# Altium PCB ZasilaczPCB.PcbDoc
Units mm, origin at the board's own origin, x right, y up, seen from the top; angles counter-clockwise.
Board outline 111.5 x 50 mm, 2 copper layers (Top Layer, Bottom Layer), stack 1.571 mm thick; 20 components, 8 nets, 57 pads, 28 vias.
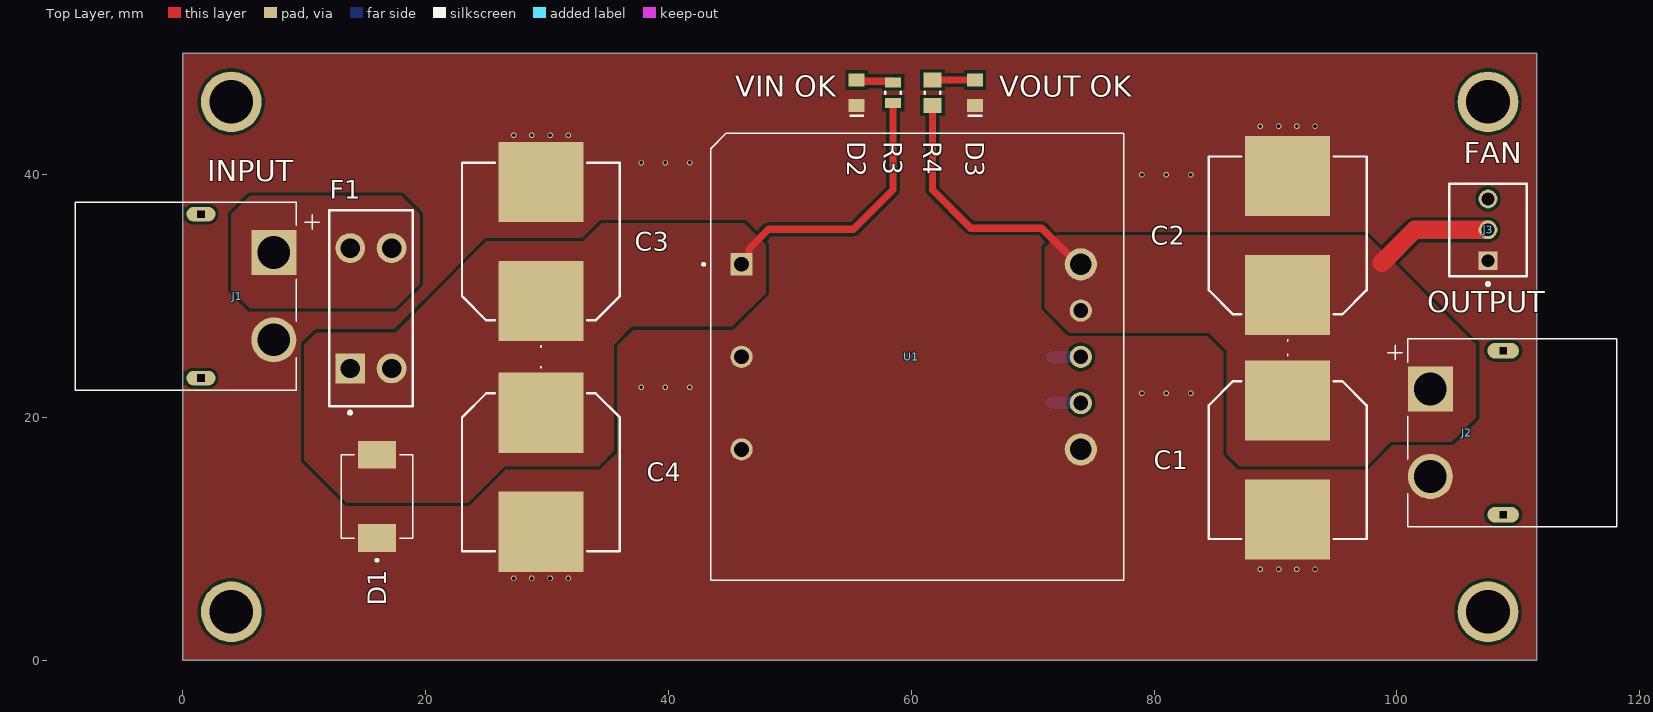
[diagram p0: Top Layer view]
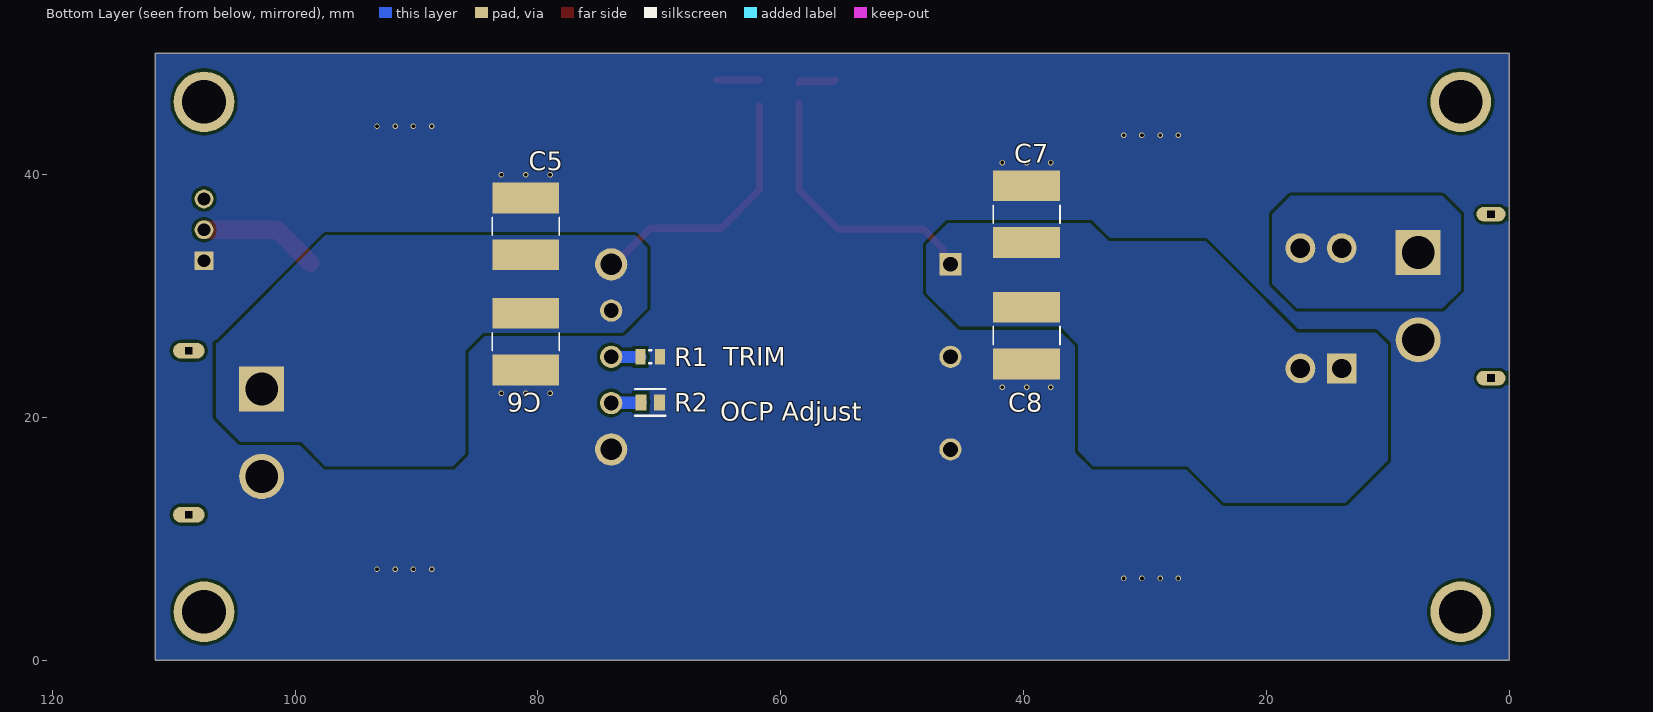
[diagram p1: Bottom Layer view, seen from below]

## Layer stack, top to bottom
Top Solder: solder mask 0.0102, Solder Resist, Dk 3.5
Top Layer: signal copper 0.0356
Dielectric 1: dielectric 1.5, FR-4, Dk 4.8
Bottom Layer: signal copper 0.0356
Bottom Solder: solder mask 0.0102, Solder Resist, Dk 3.5

## Board outline
0,0 111.5,0 111.5,50 0,50

## Design rules (kind name [scope] priority, off if disabled: settings)
Clearance [All] p1: gap=0.254 ignorepadtopadclearanceinfootprint=TRUE
PlaneConnect [All] p1: planeconnectstyle=Direct reliefexpansion=0.508 reliefentries=4 reliefconductorwidth=0.254 reliefairgap=0.254
PolygonConnect [All] p1: connectstyle=Direct reliefconductorwidth=0.254 reliefentries=4 polygonreliefangle="90 Angle" airgapwidth=0.254
RoutingVias [All] p1: holewidth=0.3 width=0.45 viastyle="Through Hole" minholewidth=0.2 minwidth=0.45 maxholewidth=0.3 maxwidth=0.7
SolderMaskExpansion [All] p1: expansion=0.102 istentingtop=FALSE
SupplyNets "Schematic Supply Nets_5" [InNet('VBAT')] p1: voltage=0.000
SupplyNets "Schematic Supply Nets_4" [InNet('+19')] p2: voltage=0.000
SupplyNets "Schematic Supply Nets_1" [InNet('VIN')] p3: voltage=0.000
SupplyNets "Schematic Supply Nets" [InNet('GND')] p4: voltage=0.000
Width [All] p1: maxlimit=30 minlimit=0.254 preferedwidth=0.254 minimp=50.000000 maximp=50.000000 favimp=50.000000
29 further rules are at their usual default settings.

## Components (designator, comment, footprint, x,y, rotation, side; value= is the part's Value field where it differs from the comment)
C1 "330uF" RAHT1331M1UGL5005E 91,16.5 r0 top
C2 "330uF" RAHT1331M1UGL5005E 91,35 r180 top
C3 "330uF" RAHT1331M1UGL5005E 29.5,34.5 r180 top
C4 "330uF" RAHT1331M1UGL5005E 29.5,15.5 r0 top
C5 "22uF" CAPC6050X550N 81,35.75 r270 bottom
C6 "22uF" CAPC6050X550N 81,26.25 r90 bottom
C7 "22uF" CAPC6050X550N 39.75,36.75 r270 bottom
C8 "22uF" CAPC6050X550N 39.75,26.75 r90 bottom
D1 "SMDJ36A" DIOM6859X262N 16,13.5 r90 top
D2 "VIN_OK" WL-SMCW_0805_150080xx75000 55.5,46.75 r90 top
D3 "VOUT_OK" WL-SMCW_0805_150080xx75000 65.25,46.75 r90 top
F1 "3568" FP-3568-MFG 15.5,29 r90 top
J1 "XT60PW-M" AMASS_XT60PW-M 1.5,30 r270 top
J2 "XT60PW-F" AMASS_XT60PW-F 102.75,18.75 r90 top
J3 "FAN19V" MOLX-22-23-2031_V 107.5,35.46 r90 top
R1 "294R" RESC2013X60X35LL10T20 70.75,25 r0 bottom
R2 "180k" FP-CRGP0805-IPC_C 70.75,21.25 r180 bottom value=180KΩ
R3 "15k" FP-CRCW0805-e3-IPC_C 58.5,46.75 r90 top
R4 "10k" FP-CRCW0805-e3-IPC_A 61.75,46.75 r90 top
U1 "I7A4W033A033V-0F3-R" CONV_I7A4W033A033V-0F3-R 60.5,25 r0 top

## Footprints (in the part's own frame and the unit in brackets; to place one, negate y for a bottom-side part, rotate by r counter-clockwise, add the part's x,y. Pads: shape width x height; smd on the part's side, far side on the other; paste and mask are expansions set on the pad)
AMASS_XT60PW-F [mm]
  rect 3.716x3.716 / inner round 3.716 / far side rect 3.716x3.716 hole 2.7 mask+0.102: 1(3.6,0)
  round 3.716 hole 2.7 mask+0.102: 2(-3.6,0)
  oval 1.3x2.6 hole 0.6 square mask+0.102: SH1(-6.75,-6) SH2(6.75,-6)
  silkscreen extent -7.75,-15.35 7.75,3.5, body extent -7.75,-15.35 7.75,1.85, height 8.4
AMASS_XT60PW-M [mm]
  rect 3.716x3.716 / inner round 3.716 / far side rect 3.716x3.716 hole 2.7 mask+0.102: 1(-3.6,6)
  round 3.716 hole 2.7 mask+0.102: 2(3.6,6)
  oval 1.2x2.4 hole 0.6 square mask+0.102: SH1(-6.75,0) SH2(6.75,0)
  silkscreen extent -7.75,-10.35 7.75,9.75, body extent -7.75,-10.35 7.75,7.85, height 8.4
CAPC6050X550N [mm]
  rect 2.53x5.51 smd paste+0 mask+0.102: 1(-2.336,0) 2(2.336,0)
  silkscreen extent -0.75,-2.75 0.75,2.75, body extent -3,-2.5 3,2.5, height 5.5
CONV_I7A4W033A033V-0F3-R [mm]
  rect 1.83x1.83 / inner round 1.83 / far side rect 1.83x1.83 hole 1.22: 1(-14.478,7.62)
  round 1.83 hole 1.22: 2(-14.478,0) 3(-14.478,-7.62) 5(13.462,-3.81) 6(13.462,0) 7(13.462,3.81)
  round 2.655 hole 1.77: 4(13.462,-7.62) 8(13.462,7.62)
  silkscreen extent -17.7,-18.41 17.02,18.41, body extent -17.04,-18.41 17,18.41, height 25.1
DIOM6859X262N [mm]
  rect 2.29x3.12 smd: A(3.43,0) C(-3.43,0)
  silkscreen extent -5.35,-2.95 3.43,2.95, body extent -3.97,-2.95 3.97,2.95, height 2.62
FP-3568-MFG [mm]
  round 2.45 hole 1.6 paste-2539.97 mask+0: 1(-4.96,-1.7) 2(4.96,-1.7) 2(4.96,1.7)
  rect 2.45x2.45 hole 1.6 paste-2539.97 mask+0: 1(-4.96,1.7)
  silkscreen extent -8.72,-3.43 8.07,3.43, body extent -8.17,-3.53 8.17,3.53, height 0.25
FP-CRCW0805-e3-IPC_A [mil]
  rect 47.5x59.38 smd paste+0 mask+0: 1(-41.37,0) 2(41.37,0)
  silkscreen extent -3,-25 3,25, body extent -85,-49 85,49, height 10
FP-CRCW0805-e3-IPC_C [mil]
  rect 31.75x51.5 smd paste+0 mask+0: 1(-33.5,0) 2(33.5,0)
  silkscreen extent -3,-25 3,25, body extent -53,-31 53,31, height 10
FP-CRGP0805-IPC_C [mm]
  rect 0.906x1.31 smd paste+0 mask+0: 1(-0.776,0) 2(0.776,0)
  silkscreen extent -1.23,-1.1 1.23,1.1, body extent -1,-0.63 1,0.63, height 0.65
MOLX-22-23-2031_V [mm] "CONN, 3-Leads, Body 7.62x6.35mm, Pitch 2.54mm"
  rect 1.55x1.55 hole 1.05: 1(-2.54,0)
  round 1.55 hole 1.05: 2(0,0) 3(2.54,0)
  silkscreen extent -4.58,-3.18 3.81,3.18, body extent -3.73,-3.25 3.73,3.1, height 10.67
RAHT1331M1UGL5005E [mm]
  rect 7x6.6 smd: 1(0,4.9) 2(0,-4.9)
  silkscreen extent -6.5,-6.5 6.5,8.7, body extent -6.55,-7.3 6.5,7.1, height 13.52
RESC2013X60X35LL10T20 [mm] "Chip Resistor, 2-Leads, Body 2.00x1.25mm, IPC High Density"
  rect 0.8x1.25 smd: 1(-0.8,0) 2(0.8,0)
  silkscreen extent -0.1,-0.53 0.1,0.53, body extent -1.05,-0.67 1.05,0.67, height 0.6
WL-SMCW_0805_150080xx75000 [mm] "SMD Mono-color Chip LED, body 2.0x1.25mm"
  rect 1.1x1.3 smd: 1(-1.05,0) 2(1.05,0)
  silkscreen extent -2,-0.6 -1.8,0.6, body extent -1,-0.63 1,0.62, height 0.7

## Part data
C1 C2 C3 C4: library part RAHT1331M1UGL5005E, "Aluminum Organic Polymer Capacitors 50V 330uF 105C ESR=2mOhms AECQ 12.5x12.5mm"
C5 C6 C7 C8: library part CAP, "CKG57NX7S1H226M500JH / Specialty Ceramic Capacitors CKG 2220 50V 22uF X7S 20% T: 5mm"
D1: "3000W, 42.1V, 5%, Unidirectional, TVS", Package="SMC-2 Taiwan Semiconductor", Availability="In Stock", Check_prices=https://www.snapeda.com/parts/SMDJ36A/Taiwan+Semiconductor/view-part/?ref=eda, MF="Taiwan Semiconductor", MP=SMDJ36A, Price=None, Purchase-URL=https://pricing.snapeda.com/search/part/SMDJ36A/?ref=eda, SnapEDA_Link=https://www.snapeda.com/parts/SMDJ36A/Taiwan+Semiconductor/view-part/?ref=snap
D2: library part CMP-1426-00011-5, "150080RS75000 / LED Uni-Color Red 630nm 2-Pin Chip 0805(2012Metric) T/R", Case Code (Imperial)=0805, Case Code (Metric)=2012, Color=Red, Forward Current=100mA, Forward Voltage=2V, Manufacturer Lifecycle Status=ACTIVE, Manufacturer Package Identifier="0805 (2012 metric)", Max Junction Temperature (Tj)=95°C, Max Operating Temperature=85°C, Max Reverse Voltage (DC)=5V, Min Operating Temperature=-40°C, Power Dissipation=72mW, Test Current=20mA, Case/Package=0805, Dominant Wavelength=625nm, Height=700µm, Length=2mm, Lens Style="Clear, Rectangular", Lifecycle Status=Production, Luminous Intensity=150mcd, Mount="Surface Mount", Packaging="Tape and Reel", Peak Wavelength=630nm, REACH SVHC=Unknown, RoHS=Compliant, Viewing Angle=140°, Wavelength=625nm, Width=1.25mm, YEOL="1 = Estimated lifetime > 10 years"
D3: library part CMP-1426-00007-5, "150080GS75000 / WURTH ELEKTRONIK - 150080GS75000 - LED, Green, SMD, 0805, 30 mA, 3.2 V, 520 nm", Case Code (Imperial)=0805, Case Code (Metric)=2012, Color=Green, Forward Current=100mA, Forward Voltage=3.2V, Manufacturer Lifecycle Status=ACTIVE, Manufacturer Package Identifier="0805 (2012 metric)", Max Junction Temperature (Tj)=95°C, Max Operating Temperature=85°C, Max Reverse Voltage (DC)=5V, Min Operating Temperature=-40°C, Power Dissipation=105mW, Test Current=20mA, Case/Package=0805, Dominant Wavelength=525nm, Height=700µm, Length=2mm, Lens Style="Clear, Rectangular", Lifecycle Status=Production, Luminous Intensity=450mcd, Mount="Surface Mount", Packaging="Tape and Reel", Peak Wavelength=515nm, REACH SVHC=Unknown, Reverse Voltage=5V, RoHS=Compliant, Viewing Angle=140°, Wavelength=525nm, Width=1.25mm, YEOL="1 = Estimated lifetime > 10 years"
F1: library part CMP-2000-05464-2, Color=Black, Current Rating=20A, Flammability Rating="UL94 V-0", Max Operating Temperature=145°C, Min Operating Temperature=-50°C, Voltage=500V, Approvals=UL, Body Material=Nylon, Contact Material=Brass, Contact Plating=Tin, Depth=6.73mm, Fuse Current=20A, Illumination Type=Illuminated, Lead Free="Lead Free", Length=16mm, Material="Brass, Nylon, Tin", Mount="PCB, Vertical", NexarPartId=8116161, Number of Circuits=1, Number of Poles=1, Orientation=Vertical, REACH SVHC="No SVHC", RoHS=Compliant, Termination="PC Pin", Voltage Rating (AC)=500V
J3: library part CMP-2000-05242-1, "22-23-2031 / Male Header, Pitch 2.54 mm, 1 x 3 Position, Height 8.18 mm, Tail Length 3.56 mm, RoHS, Bulk", Current Rating=4A, Manufacturer=Molex, Voltage Rating=250V, Brand=Molex, Contact Gender=Pin(Male), Contact Material=Brass, Contact Plating=Tin, Datasheet URL=https://datasheet.ciiva.com/19472/232274-19472863.pdf, Datasheet Version=Sep-01, Factory Pack Quantity=16000, Housing Material=Nylon, Manufacturer URL=http://www.molex.com/, Mounting Angle=Vertical, Mounting Style=ThroughHole, Number of Positions=3Position, Number of Rows=1Row, Packaging=Bulk, Pitch=2.54mm, Product=Headers, Product Category=Headers&WireHousings, RoHS=Details, Series=6373, Termination Style=ThroughHole, Tradename=KK, Type=Locking
R1: library part CMP-1013-00448-2, "RC0805FR-07294RL / Thick Film Resistors - SMD General Purpose Chip Resistor 0805, 294Ohms, 1%, 1/8W", Manufacturer=Yageo, Part Number=RC0805FR-07294RL
R2: library part CMP-03211-011052-1, "CRGP0805F180K 180KΩ 0.33W ±100ppm/°C 1% 150V", Ambient Temperature Range High=+70°C, Manufacturer=TE, Manufacturer Part Number=CRGP0805F180K, Package=CRGP0805, Power Rating=0.33W, Resistance=180KΩ, Temperature="-55°C to +155°C", Temperature Coefficient=±100ppm/°C, Temperature Range High=+155°C, Temperature Range Low=-55°C, Tolerance=0.01, Voltage Rating=150V, Automotive=No, Category=Res, ComponentLink2Description=Datasheet, ComponentLink2URL=https://www.mouser.com/datasheet/2/418/NG_DS_9-1773463-9_A-1358566.pdf, Composition="Thick Film", Device Class L1="Passive Components", Device Class L2=Resistors, Device Class L3="Chip SMD Resistors", Height=0.65mm, Ipc Land Pattern Name=RESC200125X55, Lead Free=Yes, Octopart=https://octopart.com/crgp0805f180k-te+connectivity-91018792, RoHS=TRUE, Series=CRGP
R3: library part CMP-2001-04967-2, "CRCW080515K0FKEA / RES Thick Film, 15kΩ, 1%, 0.125W, 100ppm/°C, 0805", Case Code (Imperial)=0805, Case Code (Metric)=2012, Max Operating Temperature=155°C, Max Power Dissipation=125mW, Min Operating Temperature=-55°C, Package Quantity=10, Resistance=15kR, Temperature Coefficient=100ppm/°C, Tolerance=1%, Voltage Rating=150V, Case/Package=0805, Composition="Thick Film", Contact Plating=Tin, Depth=1.25mm, Features="Automotive AEC-Q200", Height=0.45mm, Lead Free="Lead Free", Length=2mm, Military Standard=Not, Mount="Surface Mount", Number of Terminations=2, Packaging="Tape and Reel", Power Rating=125mW, Radiation Hardening=No, Termination=SMD/SMT, Voltage Rating (DC)=150V, Weight=0.000194oz, Width=0.049inch
R4: library part CMP-2001-04908-2, "CRCW080510K0FKEA / RES Thick Film, 10kΩ, 1%, 0.125W, 100ppm/°C, 0805", Case Code (Imperial)=0805, Case Code (Metric)=2012, Max Operating Temperature=155°C, Min Operating Temperature=-55°C, Package Quantity=5000, Power Rating=125mW, Resistance=10kR, Temperature Coefficient=100ppm/°C, Tolerance=1%, Voltage Rating=150V, Case/Package=0805, Composition="Thick Film", Contact Plating=Tin, Depth=1.25mm, Height=0.45mm, Lead Free="Lead Free", Length=2mm, Military Standard=Not, Packaging="Tape and Reel", Radiation Hardening=No, Termination=SMD/SMT, Voltage Rating (DC)=150V, Weight=0.000194oz, Width=1.25mm
U1: "400W-1000W, 9-18V, 18-32V, 18-50V or 28-60V Input Non-Isolated Step Down DC-DC Converter"

## Free pads (board coordinates)
  round 5 hole 3.6: ""(4,4) ""(4,46) ""(107.5,4) ""(107.5,46)

## Via types
v1: diameter 0.45, hole 0.3, Top Layer to Bottom Layer, tented both sides, 28 vias

## Nets (pads, with @x,y where several pads share a name; then routed paths per layer and width w, separated by ;. In a path a pad name is that pad's centre, name@x,y a point inside that pad or via, vN(x,y) a via of type N, cw(c..) or ccw(c..) an arc to the next point about the centre after c; other vN are vias at no path point)
+19: C1.1 C2.1 C5.2 C6.2 J2.1 J3.2 R4.1 U1.7 U1.8 | length 31.6
  Top Layer w0.6: R4.1 61.75,38.75 64.898,35.602 70.742,35.602 73.723,32.62 U1.8
  Top Layer w1.5: 98.75,32.75 101.46,35.46 J3.2
GND: C1.2 C2.2 C3.2 C4.2 C5.1 C6.1 C7.1 C8.1 D1.C D2.1 D3.1 J1.2 J2.2 J3.1 R1.1 R2.2 U1.2 U1.3 U1.4
  other v1: 27.25,6.75 28.75,6.75 30.25,6.75 31.75,6.75 88.75,7.5 90.25,7.5 91.75,7.5 93.25,7.5 79,22 81,22 83,22 37.75,22.5 39.75,22.5 41.75,22.5 79,40 81,40 83,40 37.75,41 39.75,41 41.75,41 27.25,43.25 28.75,43.25 30.25,43.25 31.75,43.25 88.75,44 90.25,44 91.75,44 93.25,44
NetD2_2: D2.2 R3.2 | length 3.1
  Top Layer w0.6: D2.2 55.6,47.7 58.4,47.7 R3.2
NetD3_2: D3.2 R4.2 | length 3.5
  Top Layer w0.6: R4.2@61.75,47.8 D3.2@65.25,47.8
NetR1_2: R1.2 U1.6 | length 2.4
  Bottom Layer w1: R1.2 U1.6
NetR2_1: R2.1 U1.5 | length 2.5
  Bottom Layer w1: R2.1 71.556,21.22 73.932,21.22 U1.5 U1.5@73.992,21.22
VBAT: F1.2 J1.1
VIN: C3.1 C4.1 C7.2 C8.2 D1.A F1.1 R3.1 U1.1 | length 22.5
  Top Layer w0.6: U1.1 46.637,33.235 46.637,33.887 48.25,35.5 55.25,35.5 58.5,38.75 R3.1
pads on no net: J1.SH1 J1.SH2 J2.SH1 J2.SH2 J3.3

## Polygon pours and split planes (outlines as drawn)
VIN on Top Layer "VIN" (solid, pour order 5): 17.525,27 22.5,31.975 22.5,32 25,34.5 33,34.5 34.5,36 46.25,36 48,34.25 48,30.25 45.25,27.5 37,27.5 35.5,26 35.5,17.25 34.25,16 26.5,16 23.5,13 13.5,13 10,16.5 10,26 11,27
VBAT on Top Layer "VBAT" (solid, pour order 2): 4,36.75 5.5,38.25 18,38.25 19.5,36.75 19.5,31 17.5,29 5.5,29 4,30.5
GND on Top Layer "GND" (solid, pour order 11): 0,50 0,0 111.5,0 111.5,50
+19 on Top Layer "VOUT" (solid, pour order 7): 72,35 71,34 71,29 73,27 84.5,27 86,25.5 86,17 87,16 97.5,16 99.5,18 104.5,18 106.5,20 106.5,26.125 106.375,26.125 97.5,35
VIN on Bottom Layer "VIN" (solid, pour order 13): 17.5,27 22.5,32 25,34.5 33,34.5 34.5,36 46.25,36 48,34.25 48,30.25 45.25,27.5 37,27.5 35.5,26 35.5,17.25 34.25,16 26.5,16 23.5,13 13.5,13 10,16.5 10,26 11,27
GND on Bottom Layer "GND" (solid, pour order 12): 0,50 0,0 111.5,0 111.5,50
+19 on Bottom Layer "VOUT" (solid, pour order 8): 72,35 71,34 71,29 73,27 84.5,27 86,25.5 86,17 87,16 97.5,16 99.5,18 104.5,18 106.5,20 106.5,26.125 106.375,26.125 97.5,35
VBAT on Bottom Layer "VBAT" (solid, pour order 10): 4,36.75 5.5,38.25 18,38.25 19.5,36.75 19.5,31 17.5,29 5.5,29 4,30.5

## Silkscreen, mask and mechanical layers (free items; w line width, h text height)
Top Overlay:
  text "VIN OK" at 45.503,45.846 h3
  text "VOUT OK" at 67.253,45.849 h3
  text "FAN" at 105.503,40.349 h3
  text "INPUT" at 2.003,38.874 h3
  text "OUTPUT" at 102.503,28.099 h3
Bottom Overlay:
  text "TRIM" at 64.746,24.254 h1.52
  text "OCP Adjust" at 65,19.75 h1.52